# Altium PCB Phare.PcbDoc
Units mil, origin at the board's own origin, x right, y up, seen from the top; angles counter-clockwise.
Board outline 2913.39 x 3937.01 mil, 2 copper layers (Top Layer, Bottom Layer); 59 components, 31 nets, 198 pads, 9 vias.
Unrouted connection lines stored in the file: 1.
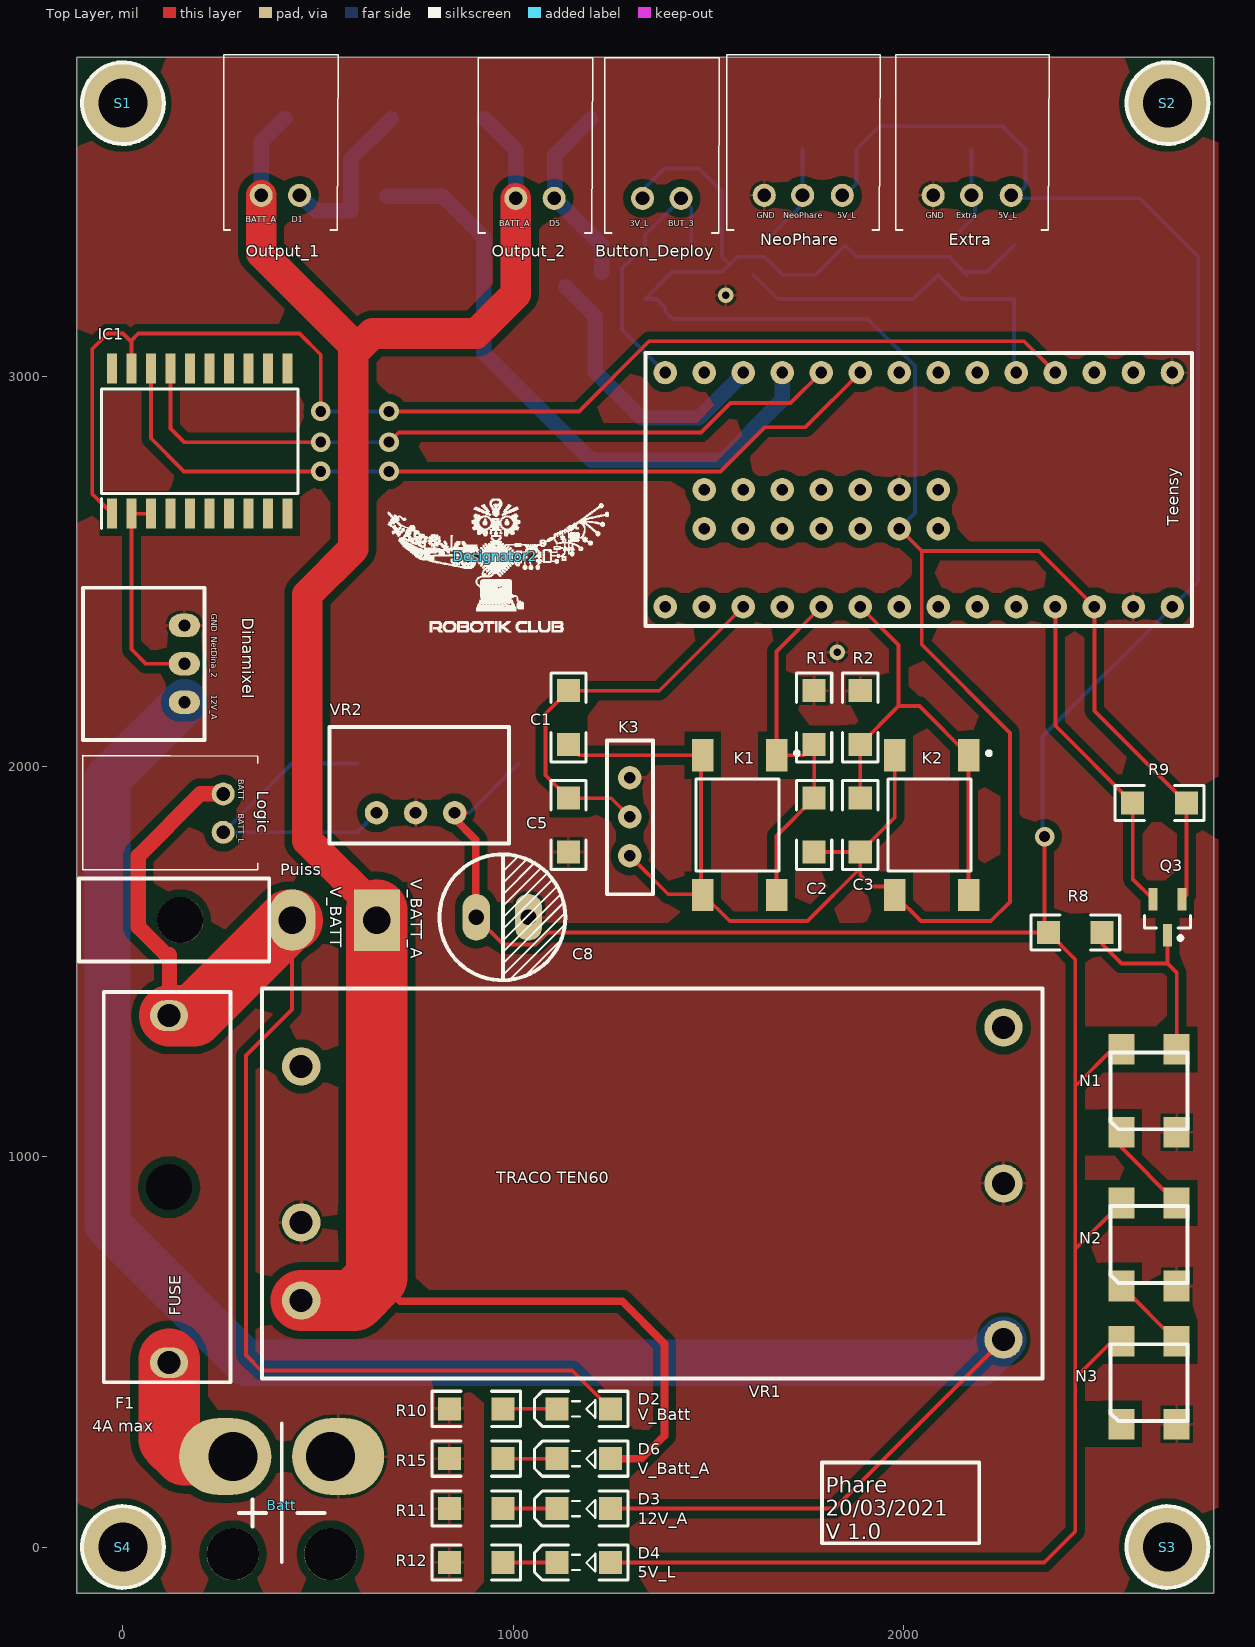
[diagram p0: Top Layer view]
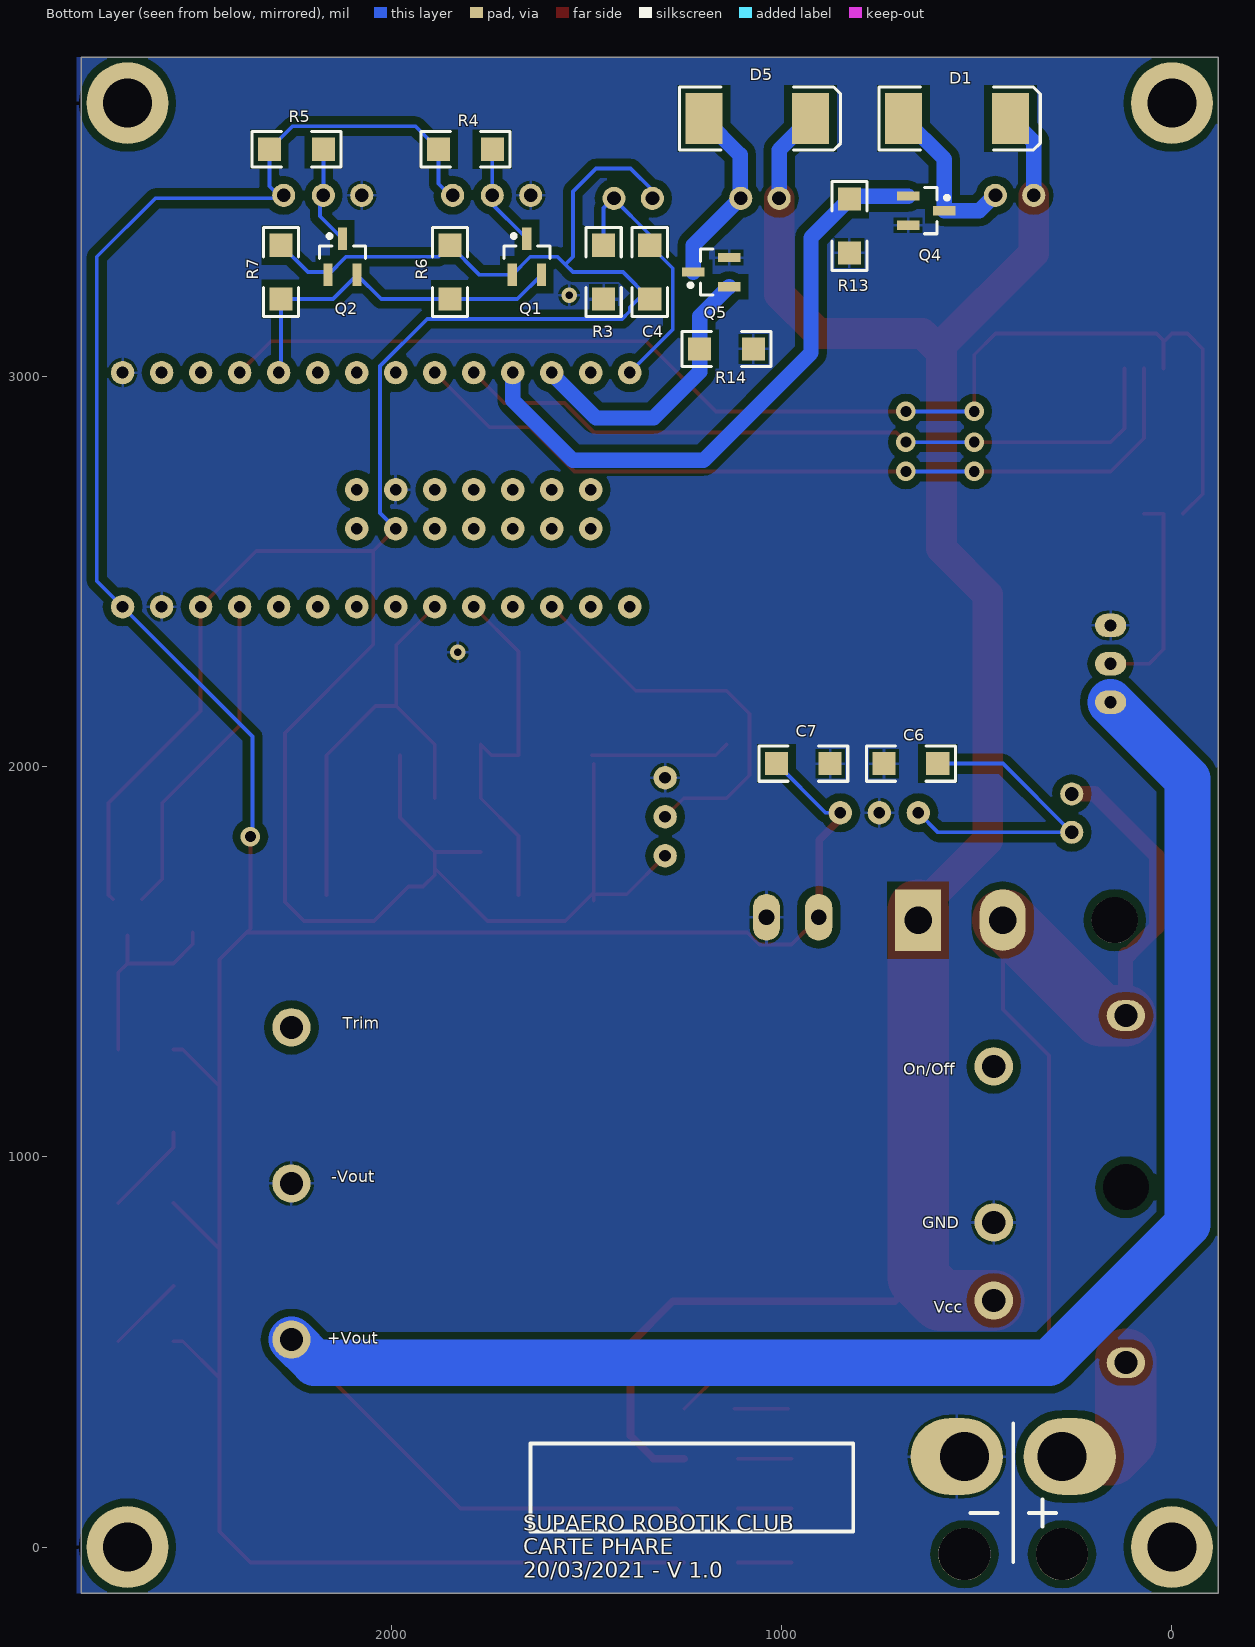
[diagram p1: Bottom Layer view, seen from below]

## Layer stack, top to bottom
Top Solder: solder mask 0.4, Solder Resist, Dk 3.5
Top Layer: signal copper 1.4
Dielectric 1: dielectric 12.6, FR-4, Dk 4.8
Bottom Layer: signal copper 1.4
Bottom Solder: solder mask 0.4, Solder Resist, Dk 3.5

## Board outline
-118.11,-118.11 2795.28,-118.11 2795.28,3818.9 -118.11,3818.9

## Design rules (kind name [scope] priority, off if disabled: settings)
Clearance [All] p1: gap=5 except(20: Arc-Poly Track-Poly SMDPad-Poly THPad-Poly Via-Poly Fill-Poly Poly-Poly Poly-Region Poly-Text)
PolygonConnect [All] p1: connectstyle=Relief reliefconductorwidth=7.87 reliefentries=4 polygonreliefangle="90 Angle" airgapwidth=7.87
RoutingVias [All] p1: holewidth=28 width=50 viastyle="Through Hole" minholewidth=28 minwidth=50 maxholewidth=28 maxwidth=50
SolderMaskExpansion [All] p1: expansion=4
Width [All] p1: maxlimit=196.85 minlimit=3.94 preferedwidth=9.84
30 further rules are at their usual default settings.

## Classes and differential pairs
component class Phare_Alim: Batt C6 C7 C8 D2 D3 D4 D6 F1 Logic Puiss R10 R11 R12 R15 S1 S2 S3 S4 VR1 VR2
component class Phare: Button_Deploy C1 C2 C3 C4 C5 D1 D5 Dinamixel Extra IC1 K1 K2 K3 N1 N2 N3 NeoPhare Output_1 Output_2 Q1 Q2 Q3 Q4 Q5 R1 R2 R3 R4 R5 R6 R7 R8 R9 R13 R14 Teensy

## Components (designator, comment, footprint, x,y, rotation, side; value= is the part's Value field where it differs from the comment)
Batt "" "Battery SALE" 531.89,231.89 r180 top
Button_Deploy "JST 2H" S2B-XH-A 1331.89,3456.89 r0 top
C1 "Cap" "Capacitor 1206" 1141.73,2125.98 r90 top
C2 "Cap" "Capacitor 1206" 1771.65,1850.39 r90 top
C3 "Cap" "Capacitor 1206" 1889.76,1850.39 r90 top
C4 "Cap" "Capacitor 1206" 1338.58,3267.72 r90 bottom
C5 "Cap" "Capacitor 1206" 1141.73,1850.39 r90 top
C6 "Cap" "Capacitor 1206" 669.29,2007.87 r0 bottom
C7 "Cap" "Capacitor 1206" 944.88,2007.87 r180 bottom
C8 "Cap" Condensateur 905.51,1614.17 r0 top locked
D1 "Diode" SMC 551.18,3661.42 r180 bottom
D2 "V_Batt" KP-3216SEC 1181.1,354.33 r180 top
D3 "12V_A" KP-3216SEC 1181.1,98.43 r180 top
D4 "5V_L" KP-3216SEC 1181.1,-39.37 r180 top
D5 "Diode" SMC 1062.99,3661.42 r180 bottom
D6 "V_Batt_A" KP-3216SEC 1181.1,226.38 r180 top
Designator2 "Comment" Logo_lowres 954.72,2539.37 r0 top
Dinamixel "Header 3" "Molex SPOX 3x1H" 157.48,2362.2 r270 top
Extra "JST 3H" S3B-XH-A 2076.77,3464.57 r0 top
F1 "4A max" Fuse 118.11,472.44 r90 top
IC1 "SN74LS241DW" SOIC127P1030X265-20N 196.85,2834.65 r90 top
K1 "4-1437565-1" FSM-SWITCH 1574.8,1850.39 r0 top
K2 "4-1437565-1" FSM-SWITCH 2066.93,1850.39 r0 top
K3 "Switch" SWITCH 1299.21,1771.65 r90 top
Logic "JST 2H" S2B-XH-A 256.89,1831.89 r90 top locked
N1 "NeoPixel" Neopixel 2559.06,1062.99 r90 top
N2 "NeoPixel" Neopixel 2559.06,669.29 r90 top
N3 "NeoPixel" Neopixel 2559.06,314.96 r90 top
NeoPhare "JST 3H" S3B-XH-A 1643.7,3464.57 r0 top
Output_1 "JST 2H" S2B-XH-A 354.33,3464.57 r0 top locked
Output_2 "JST 2H" S2B-XH-A 1006.89,3456.89 r0 top
Puiss "JST 2H" Molex_MiniFitJr_2x1H 434.13,1606.89 r180 top
Q1 "MOSFET-N" SOT23_M 1653.54,3307.09 r90 bottom
Q2 "MOSFET-N" SOT23_M 2125.98,3307.09 r90 bottom
Q3 "MOSFET-N" SOT23_M 2677.17,1614.17 r270 top
Q4 "MOSFET-N" SOT23_M 629.92,3425.2 r180 bottom
Q5 "MOSFET-N" SOT23_M 1181.1,3267.72 r0 bottom
R1 "Res2" "Resistor 1206" 1771.65,2125.98 r90 top
R2 "Res2" "Resistor 1206" 1889.76,2125.98 r90 top
R3 "Res2" "Resistor 1206" 1456.69,3267.72 r270 bottom
R4 "Res2" "Resistor 1206" 1811.02,3582.68 r180 bottom
R5 "Res2" "Resistor 1206" 2244.09,3582.68 r180 bottom
R6 "Res2" "Resistor 1206" 1850.39,3267.72 r270 bottom
R7 "Res2" "Resistor 1206" 2283.46,3267.72 r270 bottom
R8 "Res2" "Resistor 1206" 2440.94,1574.8 r0 top
R9 "Res2" "Resistor 1206" 2656.89,1906.89 r180 top
R10 "Res2" "Resistor 1206" 905.51,354.33 r0 top
R11 "Res2" "Resistor 1206" 905.51,98.43 r0 top
R12 "Res2" "Resistor 1206" 905.51,-39.37 r0 top
R13 "Res2" "Resistor 1206" 826.77,3385.83 r270 bottom
R14 "Res2" "Resistor 1206" 1141.73,3070.87 r180 bottom
R15 "Res2" "Resistor 1206" 905.51,226.38 r0 top
S1 "Screw M3" "Screw M3" 0,3700.79 r0 top
S2 "Screw M3" "Screw M3" 2677.17,3700.79 r0 top
S3 "Screw M3" "Screw M3" 2677.17,0 r0 top
S4 "Screw M3" "Screw M3" 0,0 r0 top
Teensy "Teensy 3.2" teensy 1889.76,3110.24 r270 top
VR1 "TEN30-1212" TRACO_2x1inch 456.89,631.89 r0 top locked
VR2 "TSR 2-2405" TRS 650,1881.89 r180 top

## Footprints (in the part's own frame and the unit in brackets; to place one, negate y for a bottom-side part, rotate by r counter-clockwise, add the part's x,y. Pads: shape width x height; smd on the part's side, far side on the other; paste and mask are expansions set on the pad)
"Battery SALE" [mm] "Connecteur Batterie"
  round 3.4 hole 3.4: 0(0,6.35) 0(6.35,6.35)
  oval 6x5 hole 3.2 copper offset -0.5,0: 1(0,0)
  oval 6x5 hole 3.2 copper offset 0.5,0: 2(6.35,0)
  silkscreen extent 0.38,-2.16 5.97,6.86
"Capacitor 1206" [mm]
  rect 1.5x1.5 smd: 1(-1.75,0) 2(1.75,0)
  silkscreen extent -2.89,-1.14 2.89,1.14, body extent -1.98,-0.99 1.98,0.96, height 1.3
Condensateur [mil]
  oval 70x120 hole 40: 1(0,0) 2(133.86,0)
  silkscreen extent -94,-161 228,161, body extent -93,-160 227,160, height 500
FSM-SWITCH [mm]
  rect 1.4x2.1 smd: 1(2.55,4.55) 2(2.55,-4.55) 3(-2.25,4.55) 4(-2.25,-4.55)
  silkscreen extent -2.7,-3 4,4.8, body extent -3,-5 3,5, height 1.4
Fuse [mm] "Porte-fusible monté sur circuit 10 (UL) A, 6.3 (VDE) A, fusible Cartouche, 893-0574"
  round 2 hole 3: 0(11.43,0)
  oval 2x2.5 hole 1.5: 1(0,0) 2(22.6,0)
  silkscreen extent -1.27,-4 24.13,4.25, body extent -1.27,-4.29 24.13,4.29, height 11.41
KP-3216SEC [mm]
  rect 1.5x1.5 smd: 1(-1.75,0) 2(1.75,0)
  silkscreen extent -2.89,-1.14 3.2,1.14, body extent -1.7,-0.79 1.5,0.81, height 1.1
Logo_lowres [mil]
  silkscreen extent -276,-194 291,148
"Molex SPOX 3x1H" [mil] "Prise CI, Molex, 3 Contacts, 1 rangée, entraxe 2.5mm, 3A, Coudé, ref 22-03-5035"
  oval 60x80 hole 31.5: 1(0,0) 2(98.43,0) 3(196.85,0)
  silkscreen extent -96,-260 293,51, body extent -96,-260 293,51, height 193
Molex_MiniFitJr_2x1H [mm] "Connecteur Molex 2"
  rect 3x4 hole 1.8: 1(-5.5,0)
  oval 3x4 hole 1.8: 2(0,0)
  round 3 hole 3 unplated: 3(7.3,0)
  silkscreen extent 1.5,-2.7 13.9,2.7, body extent -6.03,-2.7 13.9,3.1, height 11.01
Neopixel [mm]
  rect 2x1.7 smd: 1(5.4,0) 2(0,0) 3(0,-3.6) 4(5.4,-3.6)
  silkscreen extent 0.2,-4.3 5.2,0.7, body extent 0.19,-4.33 5.19,0.67, height 2
"Resistor 1206" [mm]
  rect 1.5x1.5 smd: 1(-1.75,0) 2(1.75,0)
  silkscreen extent -2.89,-1.14 2.89,1.14, body extent -1.98,-0.95 1.98,0.93, height 0.55
S2B-XH-A [mm]
  round 1.5 hole 0.9: 1(0,0) 2(2.5,0)
  silkscreen extent -2.45,-2.26 5,9.14, body extent -2.41,-2.32 4.99,9.18, height 6.15
S3B-XH-A [mm]
  round 1.5 hole 0.9: 1(0,0) 2(2.5,0) 3(5.08,0)
  silkscreen extent -2.45,-2.26 7.54,9.14, body extent -2.44,-2.27 7.46,9.23, height 6.15
"Screw M3" [mm] "M3 iso Screw"
  round 5.32 hole 3.2 unplated: 0(0,0)
  silkscreen extent -2.66,-2.66 2.66,2.66
SMC [mm] "DO-214-AB/SMC; 2 C-Bend Leads; Body 7.9 x 5.9 mm, inc. leads (LxW)"
  rect 2.4x3.3 smd: 1(-3.475,0) 2(3.475,0)
  silkscreen extent -5.07,-2.05 5.43,2.05
SOIC127P1030X265-20N [mm]
  rect 1.95x0.65 smd: 1(-4.725,5.715) 2(-4.725,4.445) 3(-4.725,3.175) 4(-4.725,1.905) 5(-4.725,0.635) 6(-4.725,-0.635) 7(-4.725,-1.905) 8(-4.725,-3.175) 9(-4.725,-4.445) 10(-4.725,-5.715) 11(4.725,-5.715) 12(4.725,-4.445) 13(4.725,-3.175) 14(4.725,-1.905) 15(4.725,-0.635) 16(4.725,0.635) 17(4.725,1.905) 18(4.725,3.175) 19(4.725,4.445) 20(4.725,5.715)
  silkscreen extent -5.7,-6.4 3.4,6.4, body extent -5.15,-6.4 5.15,6.4, height 2.65
SOT23_M [mm] "SOT23, 3-Leads, Body 2.9x1.3mm, Pitch 0.95mm, Lead Span 2.3mm - Reverse Pinning, IPC Low Density"
  rect 1.45x0.6 smd: 1(1.175,0) 2(-1.175,-0.95) 3(-1.175,0.95)
  silkscreen extent -0.1,-1.5 1.47,1.5, body extent -0.7,-1.5 0.7,1.5, height 1.1
SWITCH [mil] "2 pos switch,  09.03290.01"
  round 60 hole 30: 0(0,0) 1(100,0) 2(200,0)
  silkscreen extent -98,-59 295,59, body extent -98,-59 295,59, height 291
teensy [mil] "Teensy 3.2"
  round 60 hole 30: 0(100,700) 1(100,600) 2(100,500) 3(100,400) 4(100,300) 5(100,200) 6(100,100) 7(100,0) 8(100,-100) 9(100,-200) 10(100,-300) 11(100,-400) 12(100,-500) 13(700,-500) 14(700,-400) 15(700,-300) 16(700,-200) 17(700,-100) 18(700,0) 19(700,100) 20(700,200) 21(700,300) 22(700,400) 23(700,500) 24(400,0) 25(400,-100) 26(400,-200) 27(400,-300) 28(400,-400) 29(500,-400) 30(500,-300) 31(500,-200) 32(500,-100) 33(500,0) 36(400,200) 37(500,200) 39(500,100) 40(400,100) 41(700,600) 42(700,700) 43(700,800) 44(100,800)
  silkscreen extent 50,-550 750,850, body extent 48,-550 752,907, height 505
TRACO_2x1inch [mm]
  round 2.5 hole 1.5: 1(0,0) 2(0,5.08) 3(0,15.24) 4(45.72,-2.54) 5(45.72,7.62) 6(45.72,17.78)
  silkscreen extent -2.54,-5.08 48.26,20.32, body extent -2.54,-5.08 48.26,20.32, height 10.21
TRS [mil]
  round 60 hole 30: 1(0,0) 2(-100,0) 3(-200,0)
  silkscreen extent -340,-220 121,79, body extent -341,-218 120,80, height 398

## Part data
Batt Button_Deploy Logic Output_1 Output_2 Puiss: library part "Header 2", "Header, 2-Pin"
C1 C2 C3 C4 C5 C6 C7 C8: "Capacitor"
D1 D5: "Default Diode"
D2 D3 D4 D6: library part LED2, "Typical RED, GREEN, YELLOW, AMBER GaAs LED"
Dinamixel: "Header, 3-Pin"
Extra NeoPhare: library part "Header 3", "Header, 3-Pin"
F1: library part "Fuse 2", "Fuse"
IC1: "Integrated Circuit"
K1 K2: "Switch"
K3: "3 pos switch, 09.03290.01"
Q1 Q2 Q3 Q4 Q5: "N-Channel MOSFET"
R1 R2 R3 R4 R5 R6 R7 R8 R9 R10 R11 R12 R13 R14 R15: "Resistor"
Teensy: library part teensy3.2
VR1: library part TEN50, "TRACO TEN50"
VR2: library part "Volt Reg", "Voltage Regulator"

## Via types
v1: diameter 50, hole 28, Top Layer to Bottom Layer, 7 vias
v2: diameter 39.37, hole 19.68, Top Layer to Bottom Layer, 2 vias

## Nets (pads, with @x,y where several pads share a name; then routed paths per layer and width w, separated by ;. In a path a pad name is that pad's centre, name@x,y a point inside that pad or via, vN(x,y) a via of type N, cw(c..) or ccw(c..) an arc to the next point about the centre after c; other vN are vias at no path point)
3V_L: Button_Deploy.1 C1.1 C2.1 C3.1 C4.1 K1.3 K1.4 K2.3 K2.4 K3.0 Q1.3 Q2.3 Q3.3 R6.1 R7.1 R9.1 Teensy.39 Teensy.41 | length 7551.5
  Top Layer w9.84: C1.1 1169.29,2029.53 K1.3 ; K3.0 1397.64,1673.23 1486.22,1673.23 1555.12,1604.33 1754.33,1604.33 1889.76,1739.76 ; K1.4@1481.89,1656.89 K1.3@1481.89,2006.89 ; C2.1 C3.1 ; K2.3 1978.35,1870.08 C3.1 ; Teensy.39 2047.24,2552.76 ; Q3.3 2725.79,1671.65 R9.1 2489.76,2142.91 Teensy.41 2347.24,2552.76 2047.24,2552.76 ; 1889.76,1739.76 C3.1 ; 1889.76,1739.76 1889.76,1722.44 1919.29,1692.91 1956.69,1692.91 K2.4 2045.28,1604.33 2224.41,1604.33 2273.62,1653.54 2273.62,2086.61 2047.24,2312.99 2047.24,2552.76
  Bottom Layer w9.84: Button_Deploy.1 1331.89,3477.56 1387.8,3533.46 1476.38,3533.46 1535.43,3474.41 1535.43,3307.09 1555.12,3287.4 ; Teensy.39@1989.76,2590.16 Teensy.39 2029.69,2650.16 2029.69,3026.77 1908.82,3147.64 1409.45,3147.64 1389.76,3167.32 1389.76,3177.17 1368.11,3198.82 C4.1 1407.48,3267.72 1535.43,3267.72 1555.12,3287.4 ; Q2.3 2117.13,3307.09 1879.92,3307.09 R6.1 1774.61,3260.83 Q1.3 1644.69,3307.09 1574.8,3307.09 1555.12,3287.4 ; Q2.3@2165.35,3267.72 2214.57,3267.72 R7.1
5V_L: C7.1 C8.1 D4.1 Extra.3 N1.1 N2.1 N3.1 NeoPhare.3 R4.1 R5.1 R8.1 Teensy.43 VR2.3 | length 8479
  Top Layer w9.84: C8.1 975.43,1544.25 1057.98,1544.25 1088.53,1574.8 R8.1 ; D4.1 2361.46,-39.37 2440.94,40.12 2440.94,433.07 ; v1(2362.2,1820.87) 2362.2,1584.65 R8.1 ; N3.1 2535.43,527.56 2440.94,433.07 ; N2.1 2440.94,763.78 ; N1.1 2535.43,1275.59 2440.94,1181.1 ; R8.1 2440.94,1505.91 2440.94,1181.1 ; 2440.94,433.07 2440.94,763.78 ; 2440.94,763.78 2440.94,1181.1
  Top Layer w19.68: VR2.3@846.46,1870.08 904.41,1812.13 C8.1@904.41,1614.17 ; VR2.3 VR2.3@872.91,1881.89
  Bottom Layer w9.84: VR2.3 887.8,1881.89 C7.1 ; NeoPhare.3@1850.39,3464.57 1879.92,3494.09 R4.1 1938.98,3641.73 2253.94,3641.73 R5.1 2312.99,3487.99 2281.89,3456.89 2606.1,3456.89 2755.91,3307.09 2755.91,2476.38 Teensy.43 2356.89,2077.36 v1@2356.89,1826.18
12V_A: D3.1 Dinamixel.3 VR1.4 | length 5082.4
  Top Layer w9.84: D3.1@1250,78.74 1269.68,98.43 1823.43,98.43 VR1.4
  Bottom Layer w118.11: Dinamixel.3 -39.37,1968.5 -39.37,826.77 314.96,472.44 2197.44,472.44 VR1.4
GND: Batt.1 C5.1 C6.2 C7.2 C8.2 Dinamixel.1 Extra.1 K3.2 N1.3 N2.3 N3.3 NeoPhare.1 Q4.2 Q5.2 R1.2 R2.2 R3.2 R10.1 R11.1 R12.1 R13.2 R14.2 R15.1 Teensy.40 Teensy.42 Teensy.44 VR1.2 VR1.5 VR2.2
  other v2: 1830.71,2293.31 1545.28,3208.66
NetBatt_2: Batt.2 F1.1 | length 388.2
  Top Layer w157.48: F1.1@118.11,481.89 118.11,275.59 157.48,236.22 277.56,236.22 Batt.2
NetD1_1: D1.1 Output_1.2 Q4.1 | length 425.1
  Bottom Layer w39.37: Output_1.2@454.33,3464.57 493.7,3425.2 Q4.1 583.66,3557.09 D1.1
NetD2_2: D2.2 R10.2 | length 137.8
  Top Layer w9.84: R10.2@984.25,354.33 D2.2@1122.05,354.33
NetD3_2: D3.2 R11.2 | length 137.8
  Top Layer w9.84: R11.2 D3.2
NetD4_2: D4.2 R12.2 | length 137.8
  Top Layer w9.84: R12.2 D4.2
NetD5_1: D5.1 Output_2.2 Q5.1 | length 482.1
  Bottom Layer w39.37: D5.1 1106.89,3568.5 1106.89,3456.89 1227.36,3336.42 Q5.1
NetD6_2: D6.2 R15.2 | length 137.8
  Top Layer w9.84: R15.2 D6.2
NetDinamixel_2: Dinamixel.2 IC1.2 IC1.3 | length 548.7
  Top Layer w9.84: IC1.3 IC1.2 21.85,2300.98 59.06,2263.78 Dinamixel.2
NetExtra_2: Extra.2 Q2.1 R5.2 | length 256.6
  Bottom Layer w9.84: Q2.1 2183.46,3410.83 2183.46,3456.89 2175.2,3465.16 R5.2
NetN1_1: N1.2 N2.4 | length 239.8
  Top Layer w9.84: N1.2 2559.06,1023.62 N2.4
NetN1_3: N1.4 Q3.1 R8.2 | length 519.3
  Top Layer w9.84: R8.2 2509.84,1545.28 2559.06,1496.06 2677.17,1496.06 ; Q3.1 2677.17,1496.06 ; N1.4 2700.79,1472.44 2677.17,1496.06
NetN2_1: N2.2 N3.4 | length 200.4
  Top Layer w9.84: N2.2 N3.4
NetNeoPhare_2: NeoPhare.2 Q1.1 R4.2 | length 274.2
  Bottom Layer w9.84: Q1.1 1751.97,3451.77 1751.97,3464.57 1742.13,3474.41 R4.2
T_BUTTON_1: C2.2 K1.1 K1.2 R1.1 Teensy.17 | length 961.8
  Top Layer w9.84: K1.2 1675.2,1822.83 C2.2 R1.1 1744.09,2029.53 K1.1 1675.2,2295.67 Teensy.17
T_BUTTON_2: C3.2 K2.1 K2.2 R2.1 Teensy.18 | length 1162.1
  Top Layer w9.84: C3.2 R2.1 1988.19,2155.51 ; Teensy.18 1988.19,2311.81 1988.19,2155.51 ; K2.2 K2.1 2041.34,2155.51 1988.19,2155.51
T_BUTTON_3: Button_Deploy.2 C4.2 R3.1 Teensy.12 | length 686
  Bottom Layer w9.84: Teensy.12 1279.53,3120.47 1279.53,3277.56 C4.2 1338.58,3363.58 1431.89,3456.89 1456.69,3432.09 R3.1
T_DINAMIXEL_DATACTRL: IC1.1 IC1.19 Teensy.2 | length 3292.1
  Top Layer w9.84: IC1.1 -78.74,2699.21 -78.74,3070.87 -39.37,3110.24 0,3110.24 21.85,3088.39 ; IC1.19 21.85,3088.39 ; v1(506.89,2910.63) 506.89,3056.1 452.76,3110.24 39.37,3110.24 21.85,3092.72 21.85,3088.39 ; v1(681.89,2910.63) 1168.5,2910.63 1348.43,3090.55 2309.45,3090.55 Teensy.2
  Bottom Layer w9.84: v1(506.89,2910.63) v1(681.89,2910.63)
T_DINAMIXEL_RX: IC1.18 Teensy.7 | length 2111.8
  Top Layer w9.84: IC1.18 71.85,2841.93 156.89,2756.89 v1@481.89,2756.89 ; v1(681.89,2756.89) 1531.89,2756.89 1645.32,2870.32 1749.84,2870.32 Teensy.7
  Bottom Layer w9.84: v1(506.89,2756.89) v1(681.89,2756.89)
T_DINAMIXEL_TX: IC1.17 Teensy.8 | length 1885
  Top Layer w9.84: IC1.17 121.85,2866.93 156.89,2831.89 v1@481.89,2831.89 ; v1(681.89,2831.89) 706.89,2856.89 1481.89,2856.89 1556.89,2931.89 1711.42,2931.89 Teensy.8
  Bottom Layer w9.84: v1(506.89,2831.89) v1(681.89,2831.89)
T_NEOPHARE: Q1.2 Q2.2 R6.2 R7.2 Teensy.3 | length 935.6
  Bottom Layer w9.84: Q1.2 1678.15,3198.82 R6.2 2026.58,3198.82 Q2.2 2150.59,3198.82 R7.2 2283.46,3016.54 Teensy.3
T_NEOPIXEL: Q3.2 R9.2 Teensy.23 | length 853.4
  Top Layer w9.84: Teensy.23 2389.76,2105.12 R9.2 2587.99,1712.2 Q3.2
T_OUTPUT_1: Q4.3 R13.1 Teensy.9 | length 1601.4
  Bottom Layer w39.37: Q4.3 818.9,3462.6 R13.1 925.2,3356.3 925.2,3061.02 1200.79,2785.43 1535.43,2785.43 1689.76,2939.76 Teensy.9
T_OUTPUT_2: Q5.3 R14.1 Teensy.10 | length 727.1
  Bottom Layer w39.37: Q5.3 1210.63,3154.53 R14.1 1210.63,3011.81 1328.74,2893.7 1476.38,2893.7 Teensy.10@1591.34,3008.66
T_SWITCH: C1.2 C5.2 K3.1 Teensy.15 | length 1039
  Top Layer w9.84: K3.1 1251.57,1919.29 C5.2 1082.68,1978.35 1082.68,2135.83 C1.2 1374.41,2194.88 Teensy.15
V_BATT: D2.1 F1.2 Logic.2 Puiss.2 | length 3292.9
  Top Layer w9.84: Puiss.2@433.07,1605.83 433.07,1377.95 314.96,1259.84 314.96,492.13 354.33,452.76 1151.57,452.76 D2.1
  Top Layer w39.37: 109.97,1518.15 39.37,1588.75 39.37,1771.65 198.03,1930.32 Logic.2 ; F1.2@119.29,1362.2 119.29,1518.15
  Top Layer w157.48: F1.2@119.29,1362.2 181.1,1362.2 425.79,1606.89 Puiss.2
V_BATT_A: D1.2 D5.2 D6.1 Output_1.1 Output_2.1 Puiss.1 VR1.1 | length 5582.3
  Top Layer w19.68: 650.67,690.04 710.79,629.92 1279.53,629.92 1387.8,521.65 1387.8,285.43 1328.74,226.38 D6.1
  Top Layer w78.74: Output_1.1 354.33,3316.93 590.55,3080.71 ; Puiss.1@650.67,1632.8 472.44,1811.02 472.44,2440.94 590.55,2559.06 590.55,3061.02 639.76,3110.24 905.51,3110.24 1006.89,3211.61 Output_2.1
  Top Layer w157.48: VR1.1 592.52,631.89 650.67,690.04 Puiss.1 Puiss.1@650.67,1632.8
  Bottom Layer w39.37: Output_1.1 354.33,3601.38 D1.2 ; D5.2 1006.89,3580.71 Output_2.1
V_BATT_L: C6.1 Logic.1 VR2.1 | length 830.4
  Bottom Layer w9.84: 550.98,2007.87 C6.1 ; 551.18,2007.87 432.87,2007.87 Logic.1 600,1831.89 VR2.1
pads on no net: Batt.0 F1.0 IC1.4 IC1.5 IC1.6 IC1.7 IC1.8 IC1.9 IC1.10 IC1.11 IC1.12 IC1.13 IC1.14 IC1.15 IC1.16 IC1.20 N3.2 Puiss.3 S1.0 S2.0 S3.0 S4.0 Teensy.0 Teensy.1 Teensy.4 Teensy.5 Teensy.6 Teensy.11 Teensy.13 Teensy.14 Teensy.16 Teensy.19 Teensy.20 Teensy.21 Teensy.22 Teensy.24 Teensy.25 Teensy.26 Teensy.27 Teensy.28 Teensy.29 Teensy.30 Teensy.31 Teensy.32 Teensy.33 Teensy.36 Teensy.37 VR1.3 VR1.6

## Polygon pours and split planes (outlines as drawn)
GND on Top Layer "Top Layer-No Net" (solid, pour order 0): 2806.89,3818.9 2806.89,-118.11 -118.11,-118.11 -118.11,3818.9
GND on Bottom Layer "Top Layer-No Net" (solid, pour order 2): 2806.89,3818.9 2806.89,-118.11 -118.11,-118.11 -118.11,3818.9

## Silkscreen, mask and mechanical layers (free items; w line width, h text height)
Top Overlay:
  lines w10: 1791.34,9.84 2194.88,9.84 2194.88,216.54 1791.34,216.54 1791.34,9.84
  text "GND" at 1624.02,3405.51 h15
  text "NeoPhare" at 1692.91,3405.51 h15
  text "5V_L" at 1830.71,3405.51 h15
  text "GND" at 2057.09,3405.51 h15
  text "Extra" at 2135.83,3405.51 h15
  text "5V_L" at 2244.09,3405.51 h15
  text "BATT_A" at 314.96,3395.67 h15
  text "D1" at 433.07,3395.67 h15
  text "BATT_A" at 964.57,3385.83 h15
  text "D5" at 1092.52,3385.83 h15
  text "3V_L" at 1299.21,3385.83 h15
  text "BUT_3" at 1397.64,3385.83 h15
  text "GND" at 226.38,2391.73 h15 r270
  text "NetDina_2" at 226.38,2332.68 h15 r270
  text "12V_A" at 226.38,2185.04 h15 r270
  text "BATT" at 295.28,1968.5 h15 r270
  text "BATT_L" at 295.28,1879.92 h15 r270
  text "V_BATT_A" at 738.19,1712.6 h30 r270
  text "V_BATT" at 531.5,1692.91 h30 r270
  text "Phare / 20/03/2021 / V 1.0" at 1801.18,19.69 h40
Bottom Overlay:
  lines w10: 816.93,39.37 1643.7,39.37 1643.7,265.75 816.93,265.75 816.93,39.37
  text "SUPAERO ROBOTIK CLUB / CARTE PHARE / 20/03/2021 - V 1.0" at 1663.39,-78.74 h40
Mechanical 2:
  lines w10: -118.11,-118.11 2805.12,-118.11 2805.12,3818.9 -118.11,3818.9 -118.11,-118.11

## Dimensions
2795.28,3818.9 to -118.11,3818.9 on Mechanical 3
2795.28,3818.9 to 2795.28,-118.11 on Mechanical 3

## Text inside footprints (layer, text, board x,y; h text height)
F1: Top Overlay "FUSE" at 148.11,592.44 h30 r90
VR1: Top Overlay "TRACO TEN60" at 956.89,931.89 h30; Bottom Overlay "GND" at 639.76,816.93 h30; Bottom Overlay "On/Off" at 688.98,1210.63 h30; Bottom Overlay "+Vout" at 2165.35,521.65 h30; Bottom Overlay "-Vout" at 2155.51,935.04 h30; Bottom Overlay "Trim" at 2125.98,1328.74 h30; Bottom Overlay "Vcc" at 610.24,600.39 h30